# Altium PCB STAND_SSD_2246(CPU).PcbDoc (part 2 of 7)
Units mm, origin at the board's own origin, x right, y up, seen from the top; angles counter-clockwise.
Board outline 70 x 170 mm, 8 copper layers (L1:Top, L2:GND, L3:Sig, L4:VCC, L5:Sig, L6:Sig, L7:GND, L8:Bot), stack 1.112 mm thick; 174 components, 271 nets, 1671 pads, 771 vias.
Unrouted connection lines stored in the file: 138.
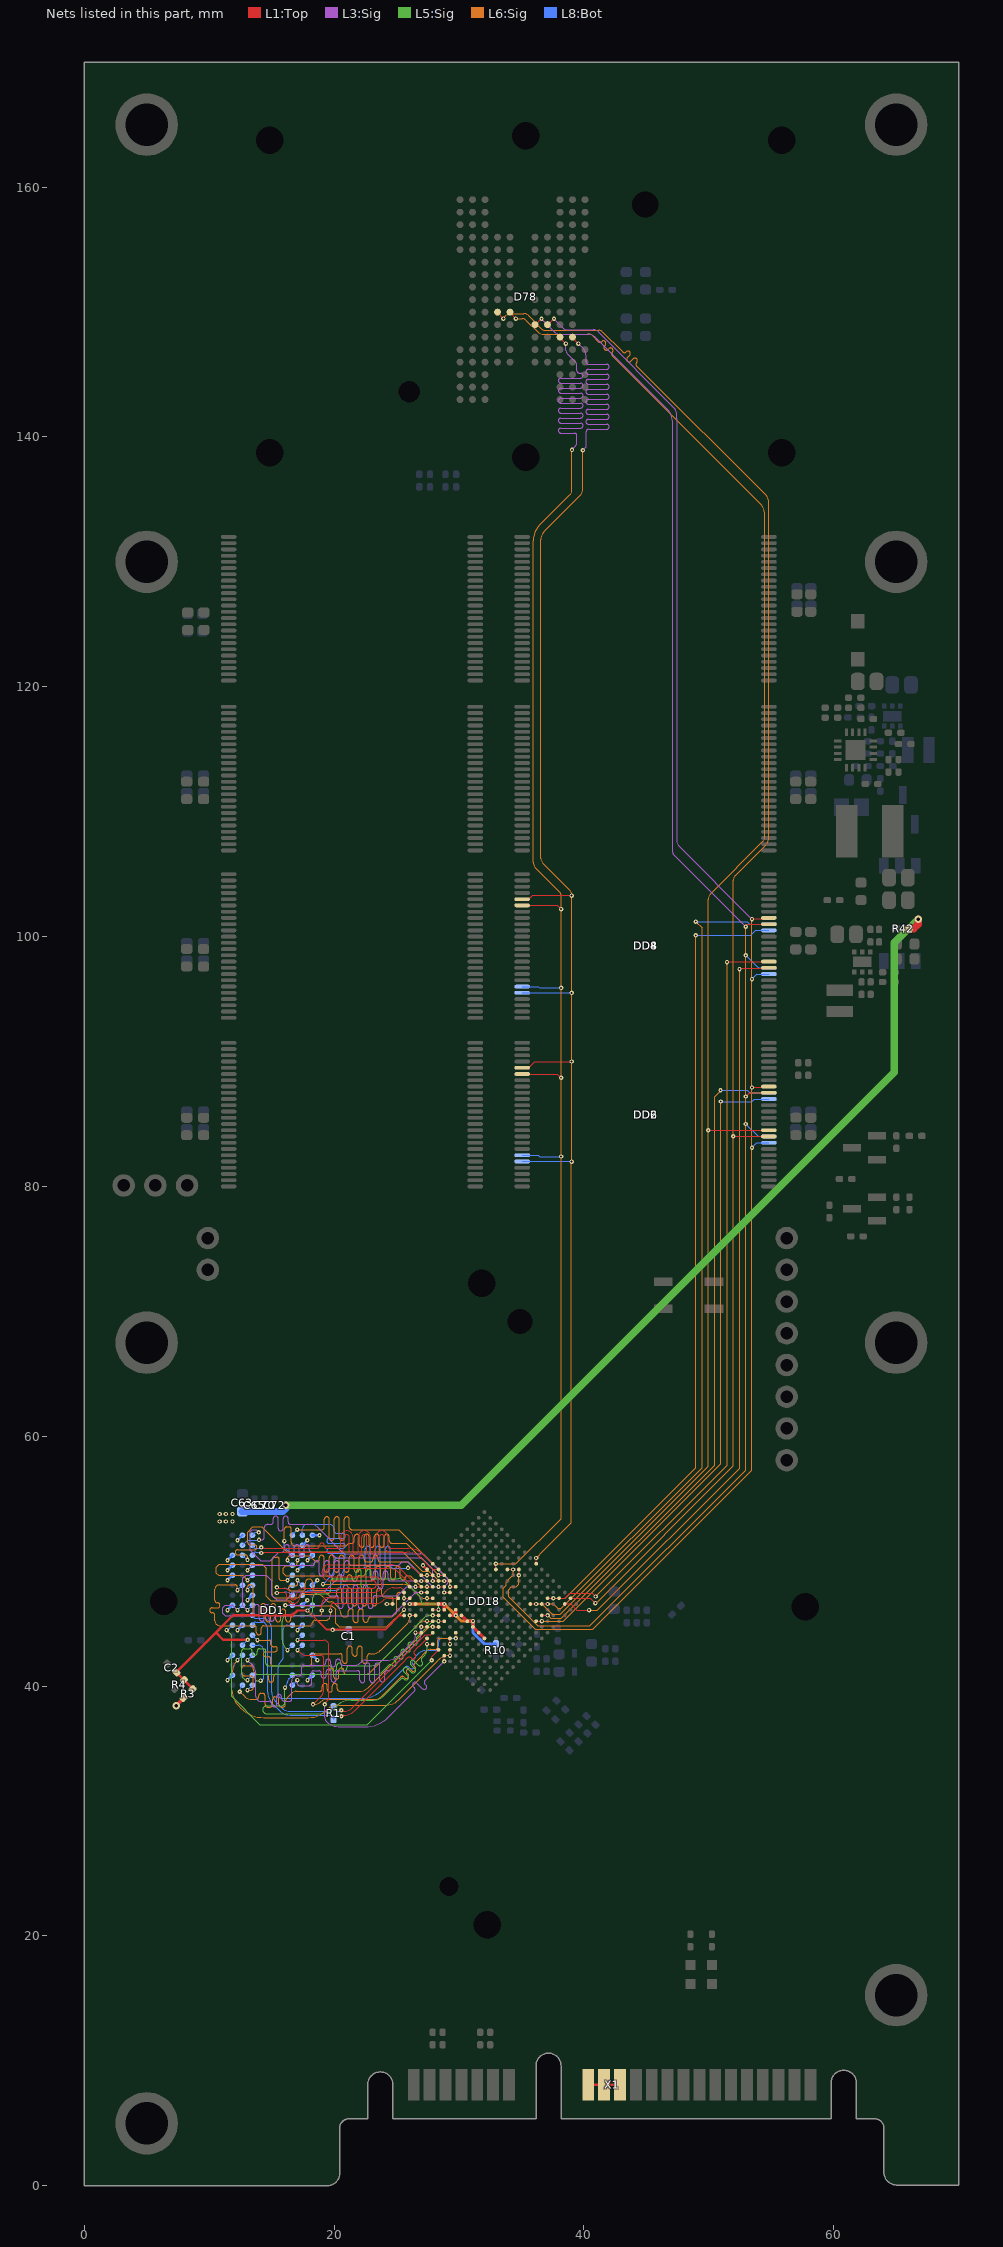
[diagram p8: the nets of this part, all layers, seen from the top]

## Via types
v1: diameter 0.35, hole 0.15, L1:Top to L8:Bot, tented both sides, 722 vias
v2: diameter 0.6, hole 0.3, L1:Top to L8:Bot, tented both sides, 45 vias
v3: diameter 0.6, hole 0.3, L1:Top to L8:Bot, tented bottom, 4 vias

## Nets (pads, with @x,y where several pads share a name; then routed paths per layer and width w, separated by ;. In a path a pad name is that pad's centre, name@x,y a point inside that pad or via, vN(x,y) a via of type N, cw(c..) or ccw(c..) an arc to the next point about the centre after c; other vN are vias at no path point) (continued)
A8: DD1.T8 DD18.C11 | length 24
  L1:Top w0.1: v1(27.903,44.741) DD18.C11@28.363,44.741
  L6:Sig w0.1: v1(12.45,39.554) 12.794,39.21 ccw(c13.439,39.855) 13.29,38.955 ccw(c13.439,39.855) 13.439,38.943 13.783,38.943 ccw(c13.783,39.12) 13.82,38.947 ccw(c13.783,39.12) 13.961,39.12 13.961,39.24 cw(c14.142,39.24) 14.142,39.421 14.28,39.421 cw(c14.28,39.218) 14.44,39.342 cw(c14.28,39.218) 14.447,39.333 cw(c14.28,39.218) 14.482,39.218 14.482,38.548 ccw(c14.707,38.548) 14.707,38.323 14.847,38.323 ccw(c14.847,38.552) 15.077,38.552 15.077,38.951 cw(c15.274,38.951) 15.274,39.148 15.357,39.148 cw(c15.357,38.929) 15.421,39.138 cw(c15.357,38.929) 15.576,38.948 cw(c15.357,38.929) 15.576,38.943 cw(c15.357,38.929) 15.577,38.929 15.577,38.538 ccw(c15.792,38.538) 15.792,38.323 15.899,38.323 ccw(c15.899,38.531) 16.107,38.531 16.107,38.739 cw(c16.567,38.739) 16.241,39.064 16.616,39.438 cw(c16.98,39.074) 16.955,39.589 cw(c16.98,39.074) 16.98,39.589 ; 16.92,39.589 16.98,39.589 ; 21.62,39.588 22.039,39.588 ccw(c22.039,40.595) 22.751,39.883 27.444,44.576 cw(c27.843,44.176) 27.843,44.741 v1(27.903,44.741) ; 21.62,39.589 20.77,39.589 20.462,39.589 cw(c20.462,39.789) 20.262,39.789 20.262,40.004 ccw(c20.062,40.004) 19.862,40.004 19.862,39.732 cw(c19.662,39.732) 19.462,39.732 19.462,40.004 ccw(c19.262,40.004) 19.062,40.004 19.062,39.789 cw(c18.862,39.789) 18.862,39.589 18.812,39.589 16.98,39.589
  L8:Bot w0.1: v1(12.45,39.554) cw(c13.185,39.554) 12.665,40.074 DD1.T8@12.67,40.079
A9: DD1.R3 DD18.A10 | length 24
  L1:Top w0.1: v1(27.444,43.362) DD18.A10@27.903,43.362
  L5:Sig w0.1: v1(16.077,39.879) 16.065,39.879 16.065,38.695 cw(c15.784,38.695) 15.784,38.414 14.598,38.414 ccw(c14.598,38.107) 14.291,38.108 14.291,38.106 ccw(c14.595,38.107) 14.595,37.803 18.776,37.803 ccw(c18.776,39.832) 18.903,37.807 ccw(c18.776,39.832) 20.211,38.397 cw(c21.382,37.226) 21.382,38.882 23.132,38.882 ccw(c23.132,40.156) 24.033,39.255 25.079,40.302 25.336,40.558 cw(c25.477,40.417) 25.618,40.558 25.624,40.552 ccw(c25.766,40.694) 25.907,40.552 ccw(c25.766,40.694) 25.907,40.835 25.587,41.155 cw(c25.729,41.296) 25.587,41.438 cw(c25.729,41.296) 25.87,41.438 26.19,41.118 ccw(c26.331,41.26) 26.473,41.118 ccw(c26.331,41.26) 26.473,41.401 26.153,41.721 cw(c26.294,41.862) 26.153,42.004 cw(c26.294,41.862) 26.436,42.004 26.755,41.684 ccw(c26.897,41.825) 27.038,41.684 ccw(c26.897,41.825) 27.038,41.967 27.033,41.972 cw(c27.174,42.114) 27.033,42.255 27.068,42.291 27.208,42.431 ccw(c26.64,42.999) 27.444,42.999 v1(27.444,43.362)
  L8:Bot w0.1: v1(16.077,39.879) 16.108,39.911 ccw(c15.761,40.257) 16.252,40.257 cw(c16.742,40.257) 16.395,40.604 ; 16.395,40.604 DD1.R3@16.67,40.879
A10: DD1.L7 DD18.B14 | length 24
  L1:Top w0.1: v1(26.065,45.66) DD18.B14@26.524,45.66
  L6:Sig w0.1: v1(13.869,43.681) 14.81,43.681 cw(c14.81,43.533) 14.915,43.637 cw(c14.861,43.583) 14.937,43.583 14.937,43.417 14.937,43.367 ccw(c15.137,43.367) 15.137,43.167 15.268,43.167 cw(c15.268,42.967) 15.268,42.767 14.536,42.767 ccw(c14.536,42.567) 14.536,42.367 14.737,42.367 cw(c14.737,42.167) 14.937,42.167 14.937,41.775 ccw(c15.069,41.775) 15.069,41.643 18.02,41.643 ccw(c18.02,41.843) 18.22,41.843 18.22,42.331 cw(c18.49,42.331) 18.49,42.6 20.17,42.6 20.47,42.6 cw(c20.47,42.4) 20.67,42.4 20.67,42.027 ccw(c20.87,42.027) 21.07,42.027 21.07,42.994 cw(c21.27,42.994) 21.47,42.994 21.47,42.606 ccw(c21.67,42.606) 21.87,42.606 21.87,42.994 cw(c22.07,42.994) 22.27,42.994 22.27,42.027 ccw(c22.47,42.027) 22.67,42.027 22.67,42.4 cw(c22.87,42.4) 22.87,42.6 22.92,42.6 23.103,42.6 ccw(c23.103,43.472) 23.72,42.855 ; 23.72,42.856 25.902,45.038 ccw(c25.51,45.43) 26.065,45.43 v1(26.065,45.66)
  L8:Bot w0.1: DD1.L7@13.47,44.079 v1(13.869,43.681)
A11: DD1.R7 DD18.D12 | length 23.9
  L1:Top w0.1: v1(27.903,45.66) DD18.D12@28.363,45.66
  L5:Sig w0.1: v1(13.072,40.481) cw(c13.072,40.932) 12.62,40.932 12.62,42.823 cw(c12.794,42.823) 12.794,42.997 13.244,42.997 cw(c13.244,42.797) 13.444,42.797 13.444,42.664 ccw(c13.644,42.664) 13.844,42.664 13.844,42.797 cw(c14.044,42.797) 14.044,42.997 14.359,42.997 14.434,42.98 cw(c14.359,42.816) 14.484,42.946 cw(c14.359,42.816) 14.54,42.816 14.54,41.843 ccw(c14.74,41.843) 14.74,41.643 19.199,41.643 19.62,41.643 cw(c19.62,41.443) 19.82,41.443 19.82,41.418 ccw(c20.02,41.418) 20.22,41.418 20.22,41.634 cw(c20.42,41.634) 20.62,41.634 20.62,41.418 ccw(c20.82,41.418) 21.02,41.418 21.02,41.443 cw(c21.22,41.443) 21.22,41.643 21.27,41.643 23.027,41.643 ccw(c23.027,42.608) 23.709,41.925 25.711,43.928 27.281,45.498 cw(c27.673,45.105) 27.673,45.66 v1(27.903,45.66)
  L8:Bot w0.1: v1(13.072,40.481) DD1.R7@13.47,40.879
A12: DD1.N7 DD18.A12 | length 23.9
  L1:Top w0.1: v1(26.524,44.281) DD18.A12@26.984,44.281
  L3:Sig w0.1: v1(13.072,42.081) 13.456,41.697 cw(c12.802,41.043) 13.727,41.043 13.727,39.182 ccw(c14.108,39.182) 14.108,38.8 14.349,38.8 14.799,38.8 cw(c14.799,38.6) 14.999,38.6 14.999,38.548 ccw(c15.199,38.548) 15.399,38.548 15.399,39.133 cw(c15.599,39.133) 15.799,39.133 15.799,39 ccw(c15.999,39) 15.999,38.8 16.382,38.8 16.474,38.8 ccw(c16.474,38.927) 16.601,38.927 16.601,40.441 cw(c17.003,40.441) 17.003,40.843 17.248,40.843 ccw(c17.248,41.015) 17.42,41.015 17.42,41.535 cw(c17.553,41.535) 17.553,41.667 19.072,41.667 19.122,41.667 ccw(c19.122,41.867) 19.322,41.867 19.322,41.96 cw(c19.522,41.96) 19.722,41.96 19.722,41.744 ccw(c19.922,41.744) 20.122,41.744 20.122,41.96 cw(c20.322,41.96) 20.522,41.96 20.522,41.867 ccw(c20.722,41.867) 20.722,41.667 21.38,41.667 21.699,41.667 ccw(c21.699,42.057) 21.86,41.702 ccw(c21.48,42.542) 22.169,41.93 cw(c22.244,41.863) 22.173,41.934 cw(c22.53,41.573) 22.53,42.081 24.34,42.081 ccw(c24.34,43.279) 25.187,42.431 26.343,43.588 ccw(c25.906,44.025) 26.524,44.025 v1(26.524,44.281)
  L8:Bot w0.1: v1(13.072,42.081) DD1.N7@13.47,42.479
A13: DD1.T3 DD18.B12 | length 23.9
  L1:Top w0.1: v1(26.984,44.741) DD18.B12@27.444,44.741
  L3:Sig w0.1: v1(17.069,40.478) 17.069,40.194 ccw(c17.22,40.194) 17.22,40.043 18.009,40.043 ccw(c18.009,40.254) 18.22,40.254 18.22,41.101 cw(c18.362,41.101) 18.362,41.243 18.459,41.243 18.768,41.243 cw(c18.768,41.043) 18.968,41.043 18.968,40.839 ccw(c19.168,40.839) 19.368,40.839 19.368,41.142 cw(c19.568,41.142) 19.768,41.142 19.768,40.522 ccw(c19.968,40.522) 20.168,40.522 20.168,41.043 cw(c20.368,41.043) 20.368,41.243 20.418,41.243 21.541,41.243 21.591,41.243 21.87,41.243 cw(c21.87,41.043) 22.07,41.043 22.07,40.484 ccw(c22.27,40.484) 22.47,40.484 22.47,41.652 cw(c22.67,41.652) 22.87,41.652 22.87,40.484 ccw(c23.07,40.484) 23.27,40.484 23.27,41.652 cw(c23.47,41.652) 23.67,41.652 23.67,40.54 ccw(c23.87,40.54) 24.07,40.54 24.07,41.043 cw(c24.27,41.043) 24.27,41.243 24.32,41.243 24.378,41.243 ccw(c24.378,41.346) 24.451,41.273 26.674,43.497 ; 26.674,43.497 ccw(c25.926,44.244) 26.984,44.244 v1(26.984,44.741)
  L8:Bot w0.1: DD1.T3@16.67,40.079 v1(17.069,40.478)
A14: DD1.T7 DD18.C12 | length 23.9
  L1:Top w0.1: v1(27.443,45.201) DD18.C12@27.903,45.201
  L6:Sig w0.1: v1(13.072,39.681) 13.337,39.681 ccw(c13.337,39.883) 13.54,39.883 13.54,40.593 ccw(c13.32,40.593) 13.32,40.813 12.872,40.813 cw(c12.872,41.064) 12.62,41.064 12.62,41.424 cw(c12.839,41.424) 12.839,41.643 13.32,41.643 cw(c13.32,41.443) 13.52,41.443 13.52,41.35 ccw(c13.927,41.35) 13.805,40.962 ccw(c13.927,41.35) 13.927,40.943 14.115,40.943 14.565,40.943 cw(c14.565,40.743) 14.765,40.743 14.765,40.515 ccw(c14.965,40.515) 15.165,40.515 15.165,40.743 cw(c15.365,40.743) 15.365,40.943 15.92,40.943 19.336,40.943 19.386,40.943 ccw(c19.386,41.143) 19.586,41.143 19.586,41.241 cw(c19.786,41.241) 19.986,41.241 19.986,40.77 ccw(c20.186,40.77) 20.386,40.77 20.386,41.241 cw(c20.586,41.241) 20.786,41.241 20.786,41.143 ccw(c20.986,41.143) 20.986,40.943 21.366,40.943 22.452,40.943 ccw(c22.452,41.606) 22.92,41.137 26.821,45.038 cw(c27.214,44.646) 27.214,45.201 v1(27.443,45.201)
  L8:Bot w0.1: v1(13.072,39.681) DD1.T7@13.47,40.079
A15: DD1.M7 DD18.D11 | length 24
  L1:Top w0.1: v1(28.363,45.201) DD18.D11@28.822,45.201
  L5:Sig w0.1: v1(14.12,40.443) 13.793,40.443 cw(c13.793,40.537) 13.699,40.537 13.699,40.83 cw(c13.812,40.83) 13.812,40.943 23.355,40.943 ccw(c23.355,41.645) 23.851,41.148 24.045,41.342 24.363,41.66 cw(c24.504,41.519) 24.646,41.66 24.652,41.654 ccw(c24.793,41.796) 24.935,41.654 ccw(c24.793,41.796) 24.935,41.937 24.842,42.03 cw(c24.983,42.171) 24.842,42.313 cw(c24.983,42.171) 25.125,42.313 25.217,42.22 ccw(c25.359,42.361) 25.5,42.22 ccw(c25.359,42.361) 25.5,42.503 25.408,42.596 cw(c25.549,42.737) 25.408,42.878 cw(c25.549,42.737) 25.69,42.878 25.783,42.786 ccw(c25.925,42.927) 26.066,42.786 ccw(c25.925,42.927) 26.066,43.069 25.973,43.161 cw(c26.115,43.303) 25.973,43.444 cw(c26.115,43.303) 26.256,43.444 26.349,43.351 ccw(c26.49,43.493) 26.632,43.351 ccw(c26.49,43.493) 26.632,43.634 26.626,43.64 cw(c26.767,43.782) 26.626,43.923 26.886,44.183 27.741,45.038 ; 27.741,45.038 cw(c28.133,44.646) 28.133,45.201 v1(28.363,45.201)
  L8:Bot w0.1: DD1.M7@13.47,43.279 13.927,43.279 cw(c13.927,42.84) 14.366,42.84 14.366,40.688 cw(c14.12,40.688) v1(14.12,40.443)
BA_0: DD1.M2 DD18.C9 | length 24.3
  L1:Top w0.1: v1(17.072,42.881) 17.238,42.714 ccw(c17.805,43.282) 17.805,42.479 18.923,42.479 cw(c18.923,42.226) 19.177,42.226 19.177,39.69 ; v1(18.32,38.543) 18.343,38.543 18.955,39.154 ; v1(29.282,43.362) DD18.C9@29.282,43.822 ; 18.955,39.155 ccw(c18.419,39.69) 19.177,39.69 ; 18.955,39.155 ccw(c18.419,39.69) 19.177,39.69 ; 18.955,39.155 ccw(c18.419,39.69) 19.177,39.69 ; 18.955,39.155 ccw(c18.419,39.69) 19.177,39.69
  L6:Sig w0.1: v1(18.32,38.543) 18.464,38.543 ccw(c18.464,39.197) 18.927,38.734 cw(c19.43,38.231) 19.43,38.943 23.306,38.943 ccw(c23.308,39.528) 23.722,39.114 25.005,40.398 25.323,40.716 cw(c25.465,40.574) 25.606,40.716 25.642,40.68 ccw(c25.783,40.822) 25.924,40.68 ccw(c25.783,40.822) 25.924,40.963 25.849,41.038 cw(c25.991,41.18) 25.849,41.321 cw(c25.991,41.18) 26.132,41.321 26.207,41.246 ccw(c26.349,41.387) 26.49,41.246 ccw(c26.349,41.387) 26.49,41.529 26.455,41.564 cw(c26.596,41.706) 26.455,41.847 26.728,42.12 27.439,42.831 cw(c27.709,42.562) 27.709,42.943 28.099,42.943 ccw(c28.099,43.151) 28.307,43.151 28.307,43.718 cw(c28.42,43.718) 28.42,43.831 29.163,43.831 cw(c29.163,43.712) 29.282,43.712 v1(29.282,43.362)
  L8:Bot w0.1: v1(17.072,42.881) DD1.M2@17.47,43.279
BA_1: DD1.N8 DD18.B8 | length 23.9
  L1:Top w0.1: v1(29.282,42.443) DD18.B8@29.282,42.902
  L6:Sig w0.1: v1@12.271,42.08 ccw(c13.361,40.991) 11.82,40.991 11.82,39.681 ccw(c13.555,39.681) 12.328,38.454 12.547,38.236 ccw(c14.377,40.065) 14.377,37.478 ; 14.378,37.478 17.95,37.478 ccw(c17.95,39.501) 19.381,38.07 cw(c20.38,37.071) 20.38,38.484 24.189,38.484 ccw(c24.19,39.868) 25.17,38.891 28.349,42.071 cw(c29.247,41.173) 29.247,42.443 v1(29.282,42.443)
  L8:Bot w0.1: v1(12.272,42.081) DD1.N8@12.67,42.479
BA_2: DD1.M3 DD18.D13 | length 23.9
  L1:Top w0.1: DD18.D13@27.903,46.12 v1(28.363,46.12)
  L5:Sig w0.1: v1(16.272,42.881) 16.139,43.013 cw(c16.833,43.707) 15.852,43.707 15.852,45.201 cw(c16.338,45.201) 16.338,45.687 17.92,45.687 ccw(c17.92,46.052) 18.286,46.052 18.286,47.063 cw(c18.63,47.063) 18.63,47.407 19.447,47.407 ccw(c19.447,47.681) 19.72,47.681 19.72,48.38 cw(c19.928,48.38) 19.928,48.587 21.527,48.587 21.577,48.587 ccw(c21.577,48.787) 21.777,48.787 21.777,49.147 cw(c21.977,49.147) 22.177,49.147 22.177,48.003 ccw(c22.377,48.003) 22.577,48.003 22.577,49.147 cw(c22.777,49.147) 22.977,49.147 22.977,48.787 ccw(c23.177,48.787) 23.177,48.587 23.76,48.587 25.143,48.587 cw(c25.143,47.88) 25.643,48.38 26.804,47.219 cw(c26.368,46.784) 26.984,46.784 ccw(c27.188,46.784) 27.188,46.579 28.229,46.579 28.363,46.446 v1(28.363,46.12)
  L8:Bot w0.1: v1(16.272,42.881) DD1.M3@16.67,43.279
CAS#: DD1.K3 DD18.D9 | length 24
  L1:Top w0.1: v1(29.742,43.822) DD18.D9@29.742,44.281
  L8:Bot w0.1: 15.723,41.95 ccw(c16.215,41.459) 15.519,41.459 15.519,39.351 ccw(c15.852,39.351) 15.852,39.018 22.148,39.018 ccw(c22.148,41.558) 23.944,39.762 25.26,41.079 25.701,41.52 cw(c25.843,41.378) 25.984,41.52 26.069,41.434 ccw(c26.211,41.576) 26.352,41.434 ccw(c26.211,41.576) 26.352,41.717 26.267,41.802 cw(c26.408,41.944) 26.267,42.085 26.302,42.121 26.797,42.615 ; 15.723,41.951 15.825,42.053 ccw(c15.579,42.298) 15.927,42.298 15.927,44.547 cw(c16.259,44.547) 16.259,44.879 DD1.K3@16.67,44.879 ; 26.797,42.616 cw(c27.383,42.029) 27.383,42.858 28.04,42.858 ccw(c28.04,43.181) 28.363,43.181 28.363,43.557 cw(c28.627,43.557) 28.627,43.822 v1(29.742,43.822)
CDI/DEVSLP: X1.8 X1.9 X1.10 | length 2.5
  L1:Top w0.2: X1.8@40.354,8.098 X1.9@41.624,8.098 X1.10@42.894,8.098
CKE_0: DD1.K9 DD18.A9 | length 26.2
  L1:Top w0.1: v1(27.82,42.068) 27.82,42.36 DD18.A9@28.363,42.902
  L5:Sig w0.1: v1(11.402,44.48) 11.82,44.062 11.82,39.174 14.072,36.923 22.675,36.923 v1(27.82,42.068)
  L8:Bot w0.1: v1(11.402,44.48) 11.472,44.48 DD1.K9@11.87,44.879
CNFG0: 
CNFG1: 
CNFG2: 
CS#_0: DD1.L2 DD18.A8 | length 23.2
  L1:Top w0.1: v1(17.072,43.681) 19.171,43.681 cw(c19.171,43.272) 19.58,43.272 19.58,38.933 v1@19.226,38.58 ; v1(28.822,41.983) DD18.A8@28.822,42.443
  L3:Sig w0.1: v1(19.256,38.543) 19.256,37.511 ccw(c19.766,37.511) 19.406,37.15 ccw(c20.348,38.093) 20.348,36.76 22.547,36.76 ccw(c22.547,39.3) 22.948,36.792 ccw(c22.547,39.3) 24.343,37.504 26.396,39.556 26.431,39.592 ccw(c26.29,39.733) 26.431,39.875 26.339,39.966 cw(c26.481,40.108) 26.339,40.249 cw(c26.481,40.108) 26.622,40.249 27.08,39.792 ccw(c27.221,39.933) 27.363,39.792 ccw(c27.221,39.933) 27.363,40.074 27.28,40.157 cw(c27.421,40.299) 27.28,40.44 27.494,40.654 v1(28.822,41.983)
  L8:Bot w0.1: v1(17.072,43.681) DD1.L2@17.47,44.079
CS_N0: 
CS_N1: 
CSEL: 
DA_0: 
DA_1: 
DA_2: 
DD0: 
DD1: 
DD2: 
DD3: 
DD4: 
DD5: 
DD6: 
DD7: 
DD8: 
DD9: 
DD10: 
DD11: 
DD12: 
DD13: 
DD14: 
DD15: 
DDR_CLK_N: DD1.K7 DD18.A11 R1.1 | length 24
  L1:Top w0.1: v1@20.578,37.6 20.587,37.61 cw(c20.68,37.517) 20.68,37.648 20.715,37.648 ccw(c20.715,37.694) 20.748,37.662 cw(c20.781,37.629) 20.781,37.675 20.783,37.675 ccw(c20.783,38.917) 21.661,38.039 25.561,41.939 ; 25.563,41.942 25.881,42.259 cw(c26.022,42.118) 26.164,42.259 26.2,42.223 ccw(c26.341,42.364) 26.482,42.223 ccw(c26.341,42.364) 26.482,42.506 26.447,42.542 cw(c26.588,42.683) 26.447,42.825 26.68,43.058 26.906,43.284 27.175,43.553 DD18.A11@27.444,43.822
  L8:Bot w0.1: DD1.K7@13.47,44.879 cw(c13.72,44.879) 13.72,45.129 14.314,45.129 ; 14.315,45.129 cw(c14.314,44.917) 14.463,45.068 ; 14.464,45.066 cw(c13.889,44.493) 14.702,44.493 14.702,39.525 ccw(c16.064,39.525) 15.1,38.562 15.612,38.05 ccw(c16.497,38.935) 16.497,37.684 19.682,37.684 cw(c19.682,37.584) 19.752,37.655 19.782,37.625 19.782,37.621 19.891,37.512 cw(c19.713,37.334) R1.1@19.965,37.334 cw(c20.216,37.334) 20.038,37.512 20.148,37.621 20.148,37.625 cw(c20.289,37.484) 20.289,37.684 20.494,37.684 v1@20.578,37.6
  other v1: 20.578,37.585
DDR_CLK_P: DD1.J7 DD18.B11 R1.2 | length 24
  L1:Top w0.1: v1@20.578,38.05 20.587,38.041 ccw(c20.68,38.133) 20.68,38.002 20.715,38.002 cw(c20.715,37.956) 20.748,37.989 ccw(c20.781,38.022) 20.781,37.975 ccw(c20.781,38.922) 21.45,38.252 27.32,44.123 27.745,44.123 DD18.B11@27.903,44.281
  L8:Bot w0.1: DD1.J7@13.47,45.679 ccw(c13.72,45.679) 13.72,45.429 14.054,45.429 14.195,45.429 14.316,45.429 cw(c14.316,44.923) 14.674,45.281 14.764,45.192 ; 14.764,45.191 cw(c14.189,44.617) 15.002,44.617 15.002,39.527 ccw(c16.068,39.527) 15.314,38.773 15.824,38.263 ccw(c16.498,38.937) 16.498,37.984 19.682,37.984 ccw(c19.682,38.084) 19.752,38.013 19.782,38.042 19.782,38.047 19.891,38.156 ccw(c19.713,38.334) R1.2@19.965,38.334 ccw(c20.216,38.334) 20.038,38.156 20.148,38.047 20.148,38.042 ccw(c20.289,38.184) 20.289,37.984 20.512,37.984 v1@20.578,38.05
  other v1: 20.578,38.065
DDR_VREF: C1.1 C2.1 DD1.H1 DD1.M8 DD18.A15 R3.1 R4.2 | length 28.4
  L1:Top w0.15: v1(17.877,46.054) 19.406,44.525 24.086,44.525 25.22,45.66 DD18.A15@25.605,45.66
  L1:Top w0.2: C2.1@7.373,41.102 8.635,39.839 cw(c8.548,39.752) R3.1@8.672,39.752 ; C2.1@7.461,41.207 10.544,44.29 ; v1(13.09,43.705) 11.129,43.705 10.544,44.29 ; v1(17.877,46.054) 17.061,46.054 16.686,45.679 11.934,45.679 10.544,44.29
  L8:Bot w0.1: DD1.M8@12.67,43.279 12.67,43.285 v1(13.09,43.705) ; v1(17.877,46.054) 18.27,46.448 DD1.H1@18.27,46.479
  L8:Bot w0.15: v1(19.887,44.507) 19.894,44.515 C1.1@21.181,44.515
DIOR: 
DIOW: 
DM_0: DD1.E7 DD18.B16 | length 23.9
  L1:Top w0.1: v1(25.605,46.12) DD18.B16@25.605,46.579
  L6:Sig w0.1: v1(13.072,48.481) 12.682,48.87 10.751,48.87 10.584,49.037 10.584,49.53 10.797,49.743 14.249,49.743 14.574,49.417 14.574,47.185 14.937,46.822 16.478,46.822 16.857,46.443 19.82,46.443 20.12,46.143 20.12,45.043 20.42,44.743 24.228,44.743 v1(25.605,46.12)
  L8:Bot w0.1: v1(13.072,48.481) DD1.E7@13.47,48.879
DM_1: DD1.D3 DD18.G16 | length 23.9
  L1:Top w0.1: v1(27.444,48.877) DD18.G16@27.903,48.877
  L6:Sig w0.1: v1(16.272,50.078) 16.272,50.283 16.432,50.443 18.02,50.443 18.52,49.943 18.607,49.943 ccw(c18.607,50.143) 18.807,50.143 18.807,50.272 cw(c19.007,50.272) 19.007,50.472 cw(c19.007,50.272) 19.207,50.272 19.207,49.943 19.207,49.328 ccw(c19.407,49.328) 19.407,49.128 ccw(c19.407,49.328) 19.607,49.328 19.607,49.943 19.607,50.272 cw(c19.807,50.272) 19.807,50.472 cw(c19.807,50.272) 20.007,50.272 20.007,49.943 20.007,49.328 ccw(c20.207,49.328) 20.207,49.128 ccw(c20.207,49.328) 20.407,49.328 20.407,49.943 20.407,50.272 cw(c20.607,50.272) 20.607,50.472 cw(c20.607,50.272) 20.807,50.272 20.807,49.943 20.807,49.328 ccw(c21.007,49.328) 21.007,49.128 ccw(c21.007,49.328) 21.207,49.328 21.207,49.943 21.207,50.272 cw(c21.407,50.272) 21.407,50.472 cw(c21.407,50.272) 21.607,50.272 21.607,49.943 21.607,49.328 ccw(c21.807,49.328) 21.807,49.128 ccw(c21.807,49.328) 22.007,49.328 22.007,49.943 22.007,50.272 cw(c22.207,50.272) 22.207,50.472 cw(c22.207,50.272) 22.407,50.272 22.407,50.143 ccw(c22.607,50.143) 22.607,49.943 22.807,49.943 22.92,49.943 ccw(c22.92,50.143) 23.12,50.143 23.12,50.272 cw(c23.32,50.272) 23.32,50.472 cw(c23.32,50.272) 23.52,50.272 23.52,50.126 ccw(c23.704,50.126) 23.704,49.943 25.92,49.943 26.136,49.727 26.986,48.877 v1(27.444,48.877)
  L8:Bot w0.1: v1(16.272,50.078) DD1.D3@16.67,49.679
DMACK: 
DMARQ: 
DQ0: DD1.E3 DD18.C16 | length 24
  L1:Top w0.1: v1(25.605,47.039) DD18.C16@26.065,47.039
  L6:Sig w0.1: v1(16.272,48.481) 15.746,48.481 cw(c15.746,48.606) 15.62,48.606 15.62,50.139 ccw(c15.428,50.139) 15.428,50.331 15.22,50.331 ccw(c15.22,50.151) 15.04,50.151 15.04,47.343 ccw(c15.316,47.343) 15.316,47.067 16.95,47.067 ccw(c16.95,47.538) 17.282,47.205 ; 17.283,47.205 cw(c17.616,46.872) 17.616,47.343 18.62,47.343 cw(c18.62,46.619) 19.133,47.131 19.433,46.83 ccw(c19.644,47.041) 19.644,46.743 19.767,46.743 cw(c19.767,46.373) 20.029,46.635 20.379,46.284 ; 20.379,46.284 cw(c20.038,45.943) 20.52,45.943 20.52,45.843 ccw(c20.82,45.843) 20.82,45.543 20.893,45.543 20.943,45.543 ccw(c20.943,45.743) 21.143,45.743 21.143,45.975 cw(c21.343,45.975) 21.543,45.975 21.543,45.29 ccw(c21.743,45.29) 21.943,45.29 21.943,45.975 cw(c22.143,45.975) 22.343,45.975 22.343,45.315 ccw(c22.543,45.315) 22.743,45.315 22.743,45.343 cw(c22.943,45.343) 22.943,45.543 23.24,45.543 24.502,45.543 ccw(c24.502,45.943) 24.784,45.66 24.93,45.805 ; 24.93,45.806 ccw(c24.712,46.024) 25.02,46.024 25.02,47.285 cw(c25.235,47.285) 25.235,47.499 25.395,47.499 cw(c25.395,47.29) 25.605,47.29 v1(25.605,47.039)
  L8:Bot w0.1: v1(16.272,48.481) DD1.E3@16.67,48.879
DQ1: DD1.F7 DD18.C17 | length 23.9
  L1:Top w0.1: v1(19.02,46.054) 19.02,46.582 cw(c19.531,46.582) 19.531,47.093 23.265,47.093 ccw(c23.265,48.054) 23.944,47.374 ; 23.945,47.375 24.226,47.656 cw(c24.782,47.1) 24.782,47.886 25.217,47.886 cw(c25.217,47.499) DD18.C17@25.605,47.499
  L6:Sig w0.1: v1(13.072,47.681) 13.072,47.929 cw(c13.242,47.929) 13.242,48.099 13.346,48.099 cw(c13.346,47.906) 13.54,47.906 13.54,45.838 ccw(c13.717,45.838) 13.717,45.66 13.885,45.66 13.935,45.66 ccw(c13.935,45.86) 14.135,45.86 14.135,46.392 cw(c14.335,46.392) 14.535,46.392 14.535,45.35 ccw(c14.735,45.35) 14.935,45.35 14.935,46.392 cw(c15.135,46.392) 15.335,46.392 15.335,45.35 ccw(c15.535,45.35) 15.735,45.35 15.735,45.954 cw(c15.935,45.954) 16.135,45.954 16.135,45.35 ccw(c16.335,45.35) 16.535,45.35 16.535,45.46 cw(c16.735,45.46) 16.735,45.66 17.282,45.66 18.848,45.66 ccw(c18.848,45.833) 19.02,45.833 v1(19.02,46.054)
  L8:Bot w0.1: v1(13.072,47.681) 13.072,47.725 13.426,48.079 DD1.F7@13.47,48.079
DQ2: DD1.F2 DD18.A17 | length 24
  L1:Top w0.1: v1(24.226,46.579) DD18.A17@24.686,46.579
  L6:Sig w0.1: 16.528,47.643 17.521,47.643 ccw(c17.521,47.826) 17.704,47.826 17.704,48.254 cw(c18.017,48.254) 17.705,48.277 cw(c18.017,48.254) 18.017,48.566 cw(c18.017,48.303) 18.28,48.303 18.28,47.815 ccw(c18.433,47.815) 18.433,47.662 19.201,47.662 cw(c19.201,47.643) 19.22,47.643 19.714,47.149 20.02,47.149 ccw(c20.02,47.349) 20.22,47.349 20.22,47.649 cw(c20.42,47.649) 20.42,47.849 cw(c20.42,47.649) 20.62,47.649 20.62,47.149 20.62,46.807 ccw(c20.82,46.807) 20.82,46.607 ccw(c20.82,46.807) 21.02,46.807 21.02,47.149 21.02,47.649 cw(c21.22,47.649) 21.22,47.849 cw(c21.22,47.649) 21.42,47.649 21.42,47.149 21.42,46.637 ccw(c21.62,46.637) 21.62,46.437 ccw(c21.62,46.637) 21.82,46.637 21.82,47.149 21.82,47.649 cw(c22.02,47.649) 22.02,47.849 cw(c22.02,47.649) 22.22,47.649 22.22,47.149 22.22,46.637 ccw(c22.42,46.637) 22.42,46.437 ccw(c22.42,46.637) 22.62,46.637 22.62,47.149 22.62,47.649 cw(c22.82,47.649) 22.82,47.849 cw(c22.82,47.649) 23.02,47.649 23.02,47.149 23.02,46.637 ccw(c23.22,46.637) 23.22,46.437 ccw(c23.22,46.637) 23.42,46.637 23.42,47.149 23.42,47.649 cw(c23.62,47.649) 23.62,47.849 cw(c23.62,47.649) 23.82,47.649 23.82,47.349 ccw(c24.02,47.349) 24.02,47.149 24.61,47.149 24.72,47.039 24.72,46.679 24.62,46.579 v1(24.226,46.579) ; 16.542,47.643 cw(c16.542,47.803) 16.382,47.803 16.382,47.924 cw(c16.507,47.924) 16.507,48.049 16.95,48.049 ccw(c16.95,48.181) 17.082,48.181 17.082,48.453 ccw(c17.046,48.453) v1(17.072,48.478)
  L8:Bot w0.1: v1(17.072,48.478) DD1.F2@17.47,48.079
DQ3: DD1.F8 DD18.B17 | length 24.1
  L1:Top w0.1: v1(19.72,46.043) 19.72,46.398 cw(c19.965,46.398) 19.965,46.643 23.44,46.643 ccw(c23.44,47.319) 23.918,46.841 cw(c24.397,46.363) 24.397,47.039 DD18.B17@25.145,47.039
  L6:Sig w0.1: v1(12.272,47.681) 12.272,47.91 ccw(c12.083,47.91) 12.083,48.099 10.805,48.099 ccw(c10.805,47.758) 10.464,47.758 10.464,47.408 10.464,46.869 ccw(c10.664,46.869) 10.664,46.669 10.671,46.669 cw(c10.671,46.469) 10.671,46.269 10.25,46.269 ccw(c10.25,46.069) 10.25,45.869 10.264,45.869 cw(c10.264,45.669) 10.464,45.669 10.464,45.619 10.464,45.252 ccw(c10.874,45.252) 10.874,44.843 13.09,44.843 13.589,44.843 cw(c13.589,44.643) 13.789,44.643 13.789,44.304 ccw(c13.989,44.304) 14.189,44.304 14.189,44.643 cw(c14.389,44.643) 14.389,44.843 14.439,44.843 18.07,44.843 ccw(c18.07,45.039) 18.266,45.039 cw(c18.492,45.039) 18.492,45.265 19.32,45.265 ccw(c19.32,45.665) 19.72,45.665 v1(19.72,46.043)
  L8:Bot w0.1: v1(12.272,47.681) DD1.F8@12.67,48.079 DD1.F8@12.67,48.06
DQ4: DD1.H3 DD18.E16 | length 24
  L1:Top w0.1: v1(26.524,47.958) DD18.E16@26.984,47.958
  L3:Sig w0.1: v1(16.107,46.479) 18.957,46.479 19.72,47.243 20.22,47.243 cw(c20.22,47.143) 20.32,47.143 20.32,46.424 ccw(c20.52,46.424) 20.52,46.224 ccw(c20.52,46.424) 20.72,46.424 20.72,47.243 20.72,47.894 cw(c20.92,47.894) 20.92,48.094 cw(c20.92,47.894) 21.12,47.894 21.12,47.243 21.12,46.424 ccw(c21.32,46.424) 21.32,46.224 ccw(c21.32,46.424) 21.52,46.424 21.52,47.243 21.52,47.894 cw(c21.72,47.894) 21.72,48.094 cw(c21.72,47.894) 21.92,47.894 21.92,47.243 21.92,46.424 ccw(c22.12,46.424) 22.12,46.224 ccw(c22.12,46.424) 22.32,46.424 22.32,47.243 22.32,47.894 cw(c22.52,47.894) 22.52,48.094 cw(c22.52,47.894) 22.72,47.894 22.72,47.243 22.72,46.424 ccw(c22.92,46.424) 22.92,46.224 ccw(c22.92,46.424) 23.12,46.424 23.12,47.043 cw(c23.32,47.043) 23.32,47.243 25.086,47.243 25.801,47.958 v1(26.524,47.958)
  L8:Bot w0.1: v1(16.107,46.479) DD1.H3@16.67,46.479
DQ5: DD1.H8 DD18.E15 | length 24
  L1:Top w0.1: v1(26.984,47.499) DD18.E15@27.444,47.499
  L3:Sig w0.1: v1(12.272,46.081) 11.897,46.456 11.288,46.456 11.111,46.278 11.111,45.83 11.298,45.643 13.42,45.643 ccw(c13.42,45.843) 13.62,45.843 13.62,46.325 cw(c13.82,46.325) 13.82,46.525 cw(c13.82,46.325) 14.02,46.325 14.02,45.643 14.02,45.409 ccw(c14.22,45.409) 14.22,45.209 ccw(c14.22,45.409) 14.42,45.409 14.42,45.643 14.42,46.325 cw(c14.62,46.325) 14.62,46.525 cw(c14.62,46.325) 14.82,46.325 14.82,45.643 14.82,45.409 ccw(c15.02,45.409) 15.02,45.209 ccw(c15.02,45.409) 15.22,45.409 15.22,45.443 cw(c15.42,45.443) 15.42,45.643 16.02,45.643 24.669,45.643 26.524,47.499 v1(26.984,47.499)
  L8:Bot w0.1: v1(12.272,46.081) DD1.H8@12.67,46.479
DQ6: DD1.G2 DD18.F17 | length 24
  L1:Top w0.1: v1(25.92,49.462) 26.16,49.462 cw(c26.16,48.884) 26.567,49.294 26.7,49.161 DD18.F17@26.984,48.877
  L8:Bot w0.1: DD1.G2@17.47,47.279 17.67,47.479 ; 17.671,47.48 cw(c18.153,46.997) 18.153,47.679 20.113,47.679 ccw(c20.113,48.147) 20.58,48.147 20.58,48.879 cw(c21.146,48.879) 21.146,49.445 22.26,49.445 22.31,49.445 ccw(c22.31,49.645) 22.51,49.645 22.51,50.987 cw(c22.71,50.987) 22.91,50.987 22.91,48.803 ccw(c23.11,48.803) 23.31,48.803 23.31,50.987 cw(c23.51,50.987) 23.71,50.987 23.71,48.803 ccw(c23.91,48.803) 24.11,48.803 24.11,50.987 cw(c24.31,50.987) 24.51,50.987 24.51,49.645 ccw(c24.71,49.645) 24.71,49.445 24.982,49.445 25.903,49.445 v1(25.92,49.462)
DQ7: DD1.H7 DD18.F16 | length 24
  L1:Top w0.1: v1(26.984,48.418) DD18.F16@27.444,48.418
  L3:Sig w0.1: v1(13.072,46.081) 12.71,46.443 12.71,48.617 12.97,48.877 14.586,48.877 15.02,48.443 15.02,47.284 15.396,46.908 16.184,46.908 16.819,47.543 19.22,47.543 20.095,48.418 22.92,48.418 ccw(c22.92,48.618) 23.12,48.618 23.12,49.008 cw(c23.32,49.008) 23.32,49.208 cw(c23.32,49.008) 23.52,49.008 23.52,48.418 23.52,47.983 ccw(c23.72,47.983) 23.72,47.783 ccw(c23.72,47.983) 23.92,47.983 23.92,48.418 23.92,49.008 cw(c24.12,49.008) 24.12,49.208 cw(c24.12,49.008) 24.32,49.008 24.32,48.618 ccw(c24.52,48.618) 24.52,48.418 25.22,48.418 v1(26.984,48.418)
  L8:Bot w0.1: v1(13.072,46.081) DD1.H7@13.47,46.479
DQ8: DD1.D7 DD18.G14 | length 24
  L1:Top w0.1: v1(28.363,47.958) DD18.G14@28.822,47.958
  L3:Sig w0.1: v1(13.072,49.281) 13.453,49.662 18.22,49.662 18.255,49.662 ccw(c18.255,49.827) 18.42,49.827 cw(c18.62,49.827) 18.62,50.027 cw(c18.62,49.827) 18.82,49.827 18.82,49.662 18.82,49.034 ccw(c19.02,49.034) 19.02,48.834 ccw(c19.02,49.034) 19.22,49.034 19.22,49.662 19.22,49.827 cw(c19.42,49.827) 19.42,50.027 cw(c19.42,49.827) 19.62,49.827 19.62,49.662 19.62,49.034 ccw(c19.82,49.034) 19.82,48.834 ccw(c19.82,49.034) 20.02,49.034 20.02,49.662 20.02,49.827 cw(c20.22,49.827) 20.22,50.027 cw(c20.22,49.827) 20.42,49.827 20.42,49.662 20.42,49.034 ccw(c20.62,49.034) 20.62,48.834 ccw(c20.62,49.034) 20.82,49.034 20.82,49.662 20.82,49.827 cw(c21.02,49.827) 21.02,50.027 cw(c21.02,49.827) 21.22,49.827 ccw(c21.386,49.827) 21.386,49.662 21.62,49.662 25.186,49.662 25.467,49.943 25.918,49.943 27.903,47.958 v1(28.363,47.958)
  L8:Bot w0.1: v1(13.072,49.281) DD1.D7@13.47,49.679
DQ9: DD1.C3 DD18.H15 | length 24
  L1:Top w0.1: v1(28.363,48.877) DD18.H15@28.822,48.877
  L6:Sig w0.1: v1(16.027,51.604) 16.024,51.607 16.024,52.548 cw(c16.22,52.548) 16.22,52.745 ; 16.222,52.745 16.41,52.745 cw(c16.41,52.589) 16.566,52.589 16.566,51.529 ccw(c16.852,51.529) 16.852,51.243 20.959,51.243 21.159,51.443 21.42,51.443 ccw(c21.42,51.643) 21.62,51.643 21.62,51.954 cw(c21.82,51.954) 21.82,52.154 cw(c21.82,51.954) 22.02,51.954 22.02,51.443 22.02,51.319 ccw(c22.22,51.319) 22.22,51.119 ccw(c22.22,51.319) 22.42,51.319 22.42,51.443 22.42,51.954 cw(c22.62,51.954) 22.62,52.154 cw(c22.62,51.954) 22.82,51.954 22.82,51.443 22.82,51.319 ccw(c23.02,51.319) 23.02,51.119 ccw(c23.02,51.319) 23.22,51.319 23.22,51.443 23.22,51.954 cw(c23.42,51.954) 23.42,52.154 cw(c23.42,51.954) 23.62,51.954 23.62,51.443 23.62,51.319 ccw(c23.82,51.319) 23.82,51.119 ccw(c23.82,51.319) 24.02,51.319 24.02,51.443 24.02,51.954 cw(c24.22,51.954) 24.22,52.154 cw(c24.22,51.954) 24.42,51.954 24.42,51.643 ccw(c24.62,51.643) 24.62,51.443 25.22,51.443 25.797,51.443 v1(28.363,48.877)
  L8:Bot w0.1: v1(16.027,51.604) 16.027,51.123 DD1.C3@16.67,50.479
DQ10: DD1.C8 DD18.H14 | length 23.9
  L1:Top w0.1: v1(28.822,48.418) DD18.H14@29.282,48.418
  L6:Sig w0.1: v1(13.077,50.104) 13.077,50.267 13.077,50.317 ccw(c12.877,50.317) 12.877,50.517 12.286,50.517 cw(c12.286,50.717) 12.286,50.917 13.628,50.917 ccw(c13.628,51.117) 13.628,51.317 13.277,51.317 cw(c13.277,51.517) 13.077,51.517 13.077,51.99 13.077,52.332 13.488,52.743 14.22,52.743 16.22,50.743 25.52,50.743 27.061,49.202 27.578,49.202 28.363,48.418 v1(28.822,48.418)
  L8:Bot w0.1: DD1.C8@12.67,50.479 13.045,50.104 v1(13.077,50.104)
DQ11: DD1.C2 DD18.F15 | length 23.9
  L1:Top w0.1: v1(27.443,47.958) DD18.F15@27.903,47.958
  L6:Sig w0.1: v1(17.072,50.081) 17.072,49.787 16.927,49.643 16.12,49.643 15.92,49.443 15.92,49.043 16.12,48.843 18.046,48.843 19.644,48.843 cw(c19.644,48.643) 19.844,48.643 19.844,48.595 ccw(c20.044,48.595) 20.244,48.595 20.244,48.702 cw(c20.444,48.702) 20.644,48.702 20.644,48.595 ccw(c20.844,48.595) 21.044,48.595 21.044,48.702 cw(c21.244,48.702) 21.444,48.702 21.444,48.595 ccw(c21.644,48.595) 21.844,48.595 21.844,48.643 cw(c22.044,48.643) 22.044,48.843 22.094,48.843 22.12,48.843 22.32,48.843 ccw(c22.32,49.043) 22.52,49.043 22.52,49.384 cw(c22.72,49.384) 22.72,49.584 cw(c22.72,49.384) 22.92,49.384 22.92,48.843 22.92,48.71 ccw(c23.12,48.71) 23.12,48.51 ccw(c23.12,48.71) 23.32,48.71 23.32,48.843 23.32,49.384 cw(c23.52,49.384) 23.52,49.584 cw(c23.52,49.384) 23.72,49.384 23.72,48.843 23.72,48.71 ccw(c23.92,48.71) 23.92,48.51 ccw(c23.92,48.71) 24.12,48.71 24.12,48.843 24.12,49.384 cw(c24.32,49.384) 24.32,49.584 cw(c24.32,49.384) 24.52,49.384 24.52,48.843 24.52,48.71 ccw(c24.72,48.71) 24.72,48.51 ccw(c24.72,48.71) 24.92,48.71 24.92,48.843 24.92,49.384 cw(c25.12,49.384) 25.12,49.584 cw(c25.12,49.384) 25.32,49.384 25.32,48.843 25.32,48.71 ccw(c25.52,48.71) 25.52,48.51 ccw(c25.52,48.71) 25.72,48.71 cw(c25.853,48.71) 25.853,48.843 25.92,48.843 26.099,48.843 26.984,47.958 v1(27.443,47.958)
  L8:Bot w0.1: v1(17.072,50.081) DD1.C2@17.47,50.479
DQ12: DD1.A7 DD18.G15 | length 23.9
  L1:Top w0.1: v1(27.903,48.418) DD18.G15@28.363,48.418
  L3:Sig w0.1: v1(13.977,52.304) 13.977,52.31 13.763,52.523 13.465,52.523 13.311,52.368 13.311,50.866 14.134,50.043 14.907,50.043 15.58,50.716 15.82,50.716 ccw(c15.82,50.916) 16.02,50.916 16.02,51.117 cw(c16.22,51.117) 16.22,51.317 cw(c16.22,51.117) 16.42,51.117 16.42,50.716 16.42,50.605 ccw(c16.62,50.605) 16.62,50.405 ccw(c16.62,50.605) 16.82,50.605 16.82,50.716 16.82,51.117 cw(c17.02,51.117) 17.02,51.317 cw(c17.02,51.117) 17.22,51.117 17.22,50.716 17.22,50.605 ccw(c17.42,50.605) 17.42,50.405 ccw(c17.42,50.605) 17.62,50.605 17.62,50.716 17.62,51.117 cw(c17.82,51.117) 17.82,51.317 cw(c17.82,51.117) 18.02,51.117 18.02,50.916 ccw(c18.22,50.916) 18.22,50.716 18.42,50.716 18.588,50.716 19.712,50.716 20.149,50.279 26.984,50.279 27.903,49.36 v1(27.903,48.418)
  L8:Bot w0.1: DD1.A7@13.47,52.079 13.695,52.304 v1(13.977,52.304)
DQ13: DD1.A2 DD18.E14 | length 24
  L1:Top w0.1: v1(27.443,47.039) DD18.E14@27.903,47.039
  L6:Sig w0.1: v1(19.12,48.168) 19.145,48.143 25.52,48.143 cw(c25.52,47.275) 26.134,47.889 26.821,47.201 ccw(c27.214,47.594) 27.214,47.039 v1(27.443,47.039)
  L8:Bot w0.1: DD1.A2@17.47,52.079 17.47,52.544 cw(c17.869,52.544) 17.869,52.943 19.636,52.943 cw(c19.636,52.559) 20.02,52.57 cw(c19.636,52.559) 20.02,52.559 20.02,52.476 20.02,52.426 ccw(c20.22,52.426) 20.22,52.226 20.689,52.226 cw(c20.689,52.026) 20.689,51.826 19.621,51.826 ccw(c19.621,51.626) 19.621,51.426 20.689,51.426 cw(c20.689,51.226) 20.689,51.026 19.621,51.026 ccw(c19.621,50.826) 19.621,50.626 20.689,50.626 cw(c20.689,50.426) 20.689,50.226 20.22,50.226 ccw(c20.22,50.026) 20.02,50.026 20.02,49.443 cw(c19.115,49.443) 19.755,48.803 v1(19.12,48.168)
DQ14: DD1.B8 DD18.G13 | length 24
  L1:Top w0.1: v1(28.822,47.499) DD18.G13@29.282,47.499
  L3:Sig w0.1: v1(13.995,51.704) 14.208,51.704 ccw(c14.208,51.917) 14.42,51.917 14.42,52.679 cw(c14.684,52.679) 14.684,52.943 14.876,52.943 14.926,52.943 ccw(c14.926,53.143) 15.126,53.143 15.126,53.401 cw(c15.326,53.401) 15.526,53.401 15.526,52.64 ccw(c15.726,52.64) 15.926,52.64 15.926,53.401 cw(c16.126,53.401) 16.326,53.401 16.326,53.143 ccw(c16.526,53.143) 16.526,52.943 16.853,52.943 18.17,52.943 cw(c18.17,52.26) 18.653,52.743 20.62,50.776 ccw(c21.094,51.249) 21.094,50.579 26.946,50.579 cw(c26.946,50.158) 27.244,50.456 28.497,49.202 28.688,49.012 29.052,48.648 cw(c28.822,48.418) 29.147,48.418 cw(c28.822,48.418) 29.147,48.417 cw(c28.822,48.418) 29.053,48.189 cw(c28.822,48.418) 29.052,48.188 28.957,48.093 28.89,48.026 ccw(c29.052,47.863) 28.822,47.863 v1(28.822,47.499)
  L8:Bot w0.1: DD1.B8@12.67,51.279 13.08,51.689 13.98,51.689 v1(13.995,51.704)
DQ15: DD1.A3 DD18.H13 | length 23.9
  L1:Top w0.1: v1(29.282,47.958) DD18.H13@29.742,47.958
  L6:Sig w0.1: v1(17.052,52.529) 19.02,52.529 ccw(c19.02,52.729) 19.22,52.729 19.22,53.354 cw(c19.42,53.354) 19.42,53.554 cw(c19.42,53.354) 19.62,53.354 19.62,52.529 19.62,51.893 ccw(c19.82,51.893) 19.82,51.693 ccw(c19.82,51.893) 20.02,51.893 20.02,52.529 20.02,53.354 cw(c20.22,53.354) 20.22,53.554 cw(c20.22,53.354) 20.42,53.354 20.42,52.529 20.42,51.893 ccw(c20.62,51.893) 20.62,51.693 ccw(c20.62,51.893) 20.82,51.893 20.82,52.529 20.82,53.354 cw(c21.02,53.354) 21.02,53.554 cw(c21.02,53.354) 21.22,53.354 21.22,52.729 ccw(c21.42,52.729) 21.42,52.529 21.43,52.529 25.17,52.529 27.174,50.526 29.147,48.552 29.282,48.418 v1(29.282,47.958)
  L8:Bot w0.1: DD1.A3@16.67,52.079 16.67,52.148 v1(17.052,52.529)
DQS_0_N: DD1.G3 DD18.D17 | length 24
  L1:Top w0.1: v1(15.427,47.454) cw(c15.502,47.454) 15.502,47.529 16.001,47.529 cw(c16.001,47.335) 16.196,47.335 16.196,47.124 ccw(c16.7,47.124) 16.7,46.621 16.754,46.621 ccw(c16.754,47.152) 17.285,47.152 17.285,47.268 cw(c17.546,47.268) 17.546,47.529 23.256,47.529 ccw(c23.256,48.079) 23.807,48.079 23.807,48.179 ccw(c23.243,48.179) 23.243,48.743 19.671,48.743 cw(c19.671,49.074) 19.34,49.074 19.34,49.099 cw(c19.671,49.099) 19.671,49.43 24.336,49.43 cw(c24.336,48.213) 25.196,49.074 25.913,48.358 cw(c25.522,47.968) 25.914,48.356 cw(c25.522,47.968) 26.065,48.07 cw(c25.522,47.968) 26.074,47.968 DD18.D17@26.065,47.958
  L8:Bot w0.1: v1(15.427,47.454) cw(c15.502,47.454) 15.502,47.529 16.067,47.529 cw(c16.067,46.676) DD1.G3@16.67,47.279
DQS_0_P: DD1.F3 DD18.E17 | length 24
  L1:Top w0.1: v1(15.427,47.904) ccw(c15.502,47.904) 15.502,47.829 16.001,47.829 cw(c16.001,47.335) 16.496,47.335 16.496,47.124 ccw(c16.7,47.124) 16.7,46.921 16.754,46.921 ccw(c16.754,47.152) 16.985,47.152 16.985,47.268 cw(c17.546,47.268) 17.546,47.829 23.119,47.829 ; 23.121,47.829 ccw(c23.121,48.079) 23.371,48.079 23.371,48.179 ccw(c23.107,48.179) 23.107,48.443 19.631,48.443 cw(c19.631,49.034) 19.344,48.517 cw(c19.631,49.034) 19.269,48.567 cw(c19.631,49.034) 19.163,48.672 cw(c19.631,49.034) 19.114,48.747 cw(c19.631,49.034) 19.04,49.034 19.04,49.139 cw(c19.631,49.139) 19.163,49.501 cw(c19.631,49.139) 19.269,49.607 cw(c19.631,49.139) 19.631,49.73 24.46,49.73 cw(c24.46,48.513) 25.32,49.374 ; 25.321,49.374 26.125,48.57 ccw(c26.515,48.96) 26.413,48.418 ccw(c26.515,48.96) 26.515,48.408 DD18.E17@26.524,48.418
  L8:Bot w0.1: v1(15.427,47.904) ccw(c15.502,47.904) 15.502,47.829 16.067,47.829 ccw(c16.067,48.683) DD1.F3@16.67,48.079
DQS_1_N: DD1.B7 DD18.H17 | length 24
  L1:Top w0.1: v1(14.177,51.104) 14.252,51.029 18.577,51.029 18.627,51.029 ccw(c18.627,51.229) 18.827,51.229 18.827,51.251 cw(c19.027,51.251) 19.227,51.251 19.227,51.229 ccw(c19.427,51.229) 19.427,51.029 19.72,51.029 20.12,51.029 20.32,51.029 ccw(c20.32,51.229) 20.52,51.229 20.52,51.928 cw(c21.02,51.928) 21.52,51.928 21.52,50.78 ccw(c21.72,50.78) 21.92,50.78 21.92,51.928 cw(c22.42,51.928) 22.92,51.928 22.92,50.78 ccw(c23.12,50.78) 23.32,50.78 23.32,51.928 cw(c23.82,51.928) 24.32,51.928 24.32,51.229 ccw(c24.52,51.229) 24.52,51.029 25.605,51.029 25.951,51.029 cw(c25.951,49.379) 27.119,50.546 27.843,49.822 ccw(c27.903,49.882) DD18.H17@27.903,49.797
  L8:Bot w0.1: DD1.B7@13.47,51.279 ccw(c13.72,51.279) 13.72,51.029 14.102,51.029 ccw(c14.102,51.104) v1(14.177,51.104)
DQS_1_P: DD1.C7 DD18.H16 | length 24
  L1:Top w0.1: v1(14.177,50.654) 14.252,50.729 20.12,50.729 20.32,50.729 ccw(c20.32,51.229) 20.82,51.229 20.82,51.928 cw(c21.02,51.928) 21.22,51.928 21.22,50.78 ccw(c21.72,50.78) 22.22,50.78 22.22,51.928 cw(c22.42,51.928) 22.62,51.928 22.62,50.78 ccw(c23.12,50.78) 23.62,50.78 23.62,51.928 cw(c23.82,51.928) 24.02,51.928 24.02,51.229 ccw(c24.52,51.229) 24.52,50.729 25.605,50.729 25.827,50.729 cw(c25.827,49.079) 26.994,50.246 27.745,49.495 ccw(c28.127,49.878) 28.127,49.337 DD18.H16@28.363,49.337
  L8:Bot w0.1: DD1.C7@13.47,50.479 cw(c13.72,50.479) 13.72,50.729 14.102,50.729 cw(c14.102,50.654) v1(14.177,50.654)
DRAM_1V5: C63.2 C65.1 C70.1 C72.1 DD1.A1 DD1.A8 DD1.B2 DD1.C1 DD1.C9 DD1.D2 DD1.D9 DD1.E9 DD1.F1 DD1.G7 DD1.H2 DD1.H9 DD1.K2 DD1.K8 DD1.N1 DD1.N9 DD1.R1 DD1.R9 DD18.C15 DD18.E11 DD18.E12 DD18.E13 DD18.F6 DD18.F7 DD18.F8 DD18.F9 DD18.F10 DD18.F11 DD18.G17 R3.2 R10.2 R42.2 | length 106.4
  L1:Top w0.25: v1(26.065,46.579) DD18.C15@26.524,46.579 ; v1(27.119,49.662) DD18.G17@27.444,49.337 ; DD18.E11@29.282,45.66 29.742,45.66 DD18.F11@29.742,46.12 ; DD18.F10@30.201,45.66 DD18.F9@30.661,45.201 v1(31.12,45.201) DD18.F8@31.12,44.741 DD18.F7@31.58,44.281 DD18.F6@32.04,43.822
  L1:Top w0.3: v2(7.363,38.424) 7.363,38.45 R3.2@7.863,38.95 ; DD18.E13@28.363,46.579 v1(28.822,46.579) DD18.E12@28.822,46.12
  L1:Top w0.6: R42.2@66.059,100.65 66.409,100.65 66.759,101 v2(66.759,101.4)
  L5:Sig w0.6: v2(16.14,54.479) 30.187,54.479 64.859,89.152 64.859,99.5 v2(66.759,101.4)
  L6:Sig w0.25: v1(26.065,46.579) v1(28.822,46.579) v1(29.742,45.66) 30.201,45.201 v1(31.12,45.201)
  L8:Bot w0.2: v1(11.472,40.481) DD1.R9@11.87,40.879 ; v1(11.472,42.081) DD1.N9@11.87,42.479 ; v1(11.472,46.081) DD1.H9@11.87,46.479 ; v1(11.472,48.481) DD1.E9@11.87,48.879 ; v1(11.472,49.281) DD1.D9@11.87,49.679 ; v1(11.472,50.081) DD1.C9@11.87,50.479 ; v1(12.272,44.481) DD1.K8@12.67,44.879 ; v1(12.272,51.681) DD1.A8@12.67,52.079 ; v1(13.072,46.881) DD1.G7@13.47,47.279 ; v1(17.072,44.481) DD1.K2@17.47,44.879 ; v1(17.072,49.281) DD1.D2@17.47,49.679 ; DD1.H2@17.47,46.479 v1(17.869,46.878) ; DD1.B2@17.47,51.279 v1(17.869,51.678) ; v1(17.872,40.481) DD1.R1@18.27,40.879 ; v1(17.872,50.081) DD1.C1@18.27,50.479 ; DD1.N1@18.27,42.479 v1(18.669,42.081) ; DD1.F1@18.27,48.079 v1(18.669,48.478) ; DD1.A1@18.27,52.079 v1(18.834,52.079)
  L8:Bot w0.25: v1(31.12,45.201) 31.12,44.279 32.02,43.379 R10.2@32.959,43.379
  L8:Bot w0.6: C63.2@12.67,53.979 15.878,53.979 16.14,54.241 v2(16.14,54.479)
  other v1: 10.84,53.179 11.34,53.179 11.87,53.179 10.84,53.779 11.34,53.779 11.87,53.779
F0ALE: D78.L8 DD2.17 DD4.17 DD6.17 DD8.17 DD18.P10 | length 135.7
  L1:Top w0.1: DD18.P10@33.878,49.343 DD18.P10@33.878,49.337 v1(34.338,49.337) ; D78.L8@37.139,148.993 v1(37.606,149.46) ; v1@53.459,87.94 DD2.17@54.809,87.94 ; v1@53.489,101.43 DD4.17@54.739,101.43
  L3:Sig w0.1: v1(37.606,149.46) 38.347,148.72 ccw(c38.655,149.028) 38.655,148.592 40.733,148.592 cw(c40.733,148.083) 41.093,148.443 ; 41.093,148.443 47.198,142.338 cw(c46.619,141.76) 47.438,141.76 47.438,141.457 47.438,107.65 ccw(c47.989,107.65) 47.599,107.26 v1(53.459,101.4)
  L6:Sig w0.1: v1(34.338,49.337) 34.338,48.877 34.203,48.743 33.788,48.328 33.788,48.078 33.533,47.823 33.533,47.117 36.112,44.539 40.718,44.539 53.459,57.279 v1(53.459,101.4)
  L8:Bot w0.1: v1(53.459,83.1) 53.859,83.5 DD6.17@54.814,83.5 ; v1(53.459,96.6) 53.859,97 DD8.17@54.814,97
  other v1: 53.459,87.92
F0CE0: D78.K4 DD2.9 DD18.U2 | length 128.8
  L1:Top w0.1: D78.K4@33.088,149.942 v1(33.556,149.475) ; DD18.U2@38.934,47.039 40.524,47.039 v1(40.92,46.643) ; v1@51.959,84.1 52.059,84 DD2.9@54.809,84
  L6:Sig w0.1: v1(33.556,149.475) 33.765,149.684 cw(c34.238,149.211) 34.238,149.88 35.19,149.88 cw(c35.19,149.398) 35.531,149.739 36.589,148.682 ccw(c36.955,149.048) 36.955,148.53 41.206,148.53 cw(c41.206,148.129) 41.49,148.412 43.057,146.845 43.093,146.809 ccw(c43.234,146.951) 43.376,146.809 43.384,146.818 cw(c43.526,146.676) 43.667,146.818 cw(c43.526,146.676) 43.667,146.535 43.484,146.352 ccw(c43.626,146.211) 43.484,146.069 ccw(c43.626,146.211) 43.767,146.069 43.95,146.252 cw(c44.091,146.111) 44.233,146.252 cw(c44.091,146.111) 44.233,145.969 44.224,145.961 ccw(c44.366,145.819) 44.224,145.678 44.521,145.381 54.583,135.319 cw(c54.036,134.772) 54.81,134.772 54.81,107.923 cw(c53.975,107.923) 54.565,107.333 52.11,104.878 ccw(c52.473,104.515) 51.959,104.515 v1(51.959,84.02) 51.959,57.63 40.972,46.643 v1(40.92,46.643)
F0CE1: DD4.9 DD18.T2 | length 61.1
  L1:Top w0.1: DD18.T2@38.474,46.579 38.934,46.579 39.433,46.081 v1(40.42,46.081) ; v1@52.479,97.45 DD4.9@54.729,97.45
  L6:Sig w0.1: v1(40.42,46.081) 41.087,46.081 52.459,57.453 52.459,79.8 v1(52.459,97.4)
F0CE2: D78.K5 DD2.10 DD18.N5 | length 130.6
  L1:Top w0.1: D78.K5@34.088,149.942 v1(34.556,149.475) ; DD18.N5@35.717,46.579 v1(36.176,46.579) ; v1@50.059,84.5 DD2.10@54.809,84.5
  L6:Sig w0.1: v1(34.556,149.475) 35.086,149.474 cw(c35.086,149.081) 35.364,149.359 36.302,148.42 ccw(c36.755,148.873) 36.755,148.232 40.397,148.232 cw(c40.397,147.872) 40.652,148.127 41.109,147.67 41.145,147.635 ccw(c41.286,147.776) 41.427,147.635 ; v1(36.176,46.579) 36.636,46.579 37.472,45.743 38.103,45.743 49.959,57.599 v1(49.959,84.5) 49.959,103.001 cw(c50.579,103.001) 50.141,103.439 54.324,107.623 ccw(c53.921,108.027) 54.492,108.027 54.492,133.719 ccw(c53.12,133.719) 54.09,134.689 42.473,146.306 42.276,146.503 cw(c42.417,146.645) 42.276,146.786 ccw(c42.135,146.928) 42.277,147.07 ccw(c42.135,146.928) 41.994,147.07 41.934,147.01 cw(c41.793,147.152) 41.652,147.01 cw(c41.793,147.152) 41.652,147.293 41.711,147.353 ccw(c41.57,147.494) 41.711,147.635 ccw(c41.57,147.494) 41.428,147.635
F0CE3: DD4.10 DD18.T3 | length 61.7
  L1:Top w0.1: DD18.T3@38.015,47.039 38.474,47.039 38.878,47.443 40.676,47.443 v1(40.94,47.179) ; v1@51.459,97.9 51.559,98 DD4.10@54.809,98
  L6:Sig w0.1: v1(40.94,47.179) 51.459,57.699 v1@51.459,97.9
  other v1: 51.459,97.96
F0CE4: DD6.9 DD18.N3 | length 53.1
  L1:Top w0.1: DD18.N3@36.636,45.66 v1(37.096,45.66)
  L6:Sig w0.1: v1(37.096,45.66) 37.12,45.66 37.338,45.443 38.203,45.443 50.459,57.699 50.459,87.2 50.938,87.679 v1(50.938,87.7)
  L8:Bot w0.1: v1(50.938,87.7) 53.086,87.7 53.286,87.5 DD6.9@54.814,87.5
F0CE5: DD8.9 DD18.P4 | length 67.5
  L1:Top w0.1: DD18.P4@36.636,46.579 v1(37.096,46.579)
  L6:Sig w0.1: v1(37.096,46.579) 37.555,46.579 37.892,46.243 38.203,46.243 49.459,57.499 49.459,79.2 49.459,100.7 v1(48.959,101.2)
  L8:Bot w0.1: v1(48.959,101.2) 53.089,101.2 53.289,101 DD8.9@54.814,101
F0CE6: DD6.10 DD18.M3 | length 52.9
  L1:Top w0.1: DD18.M3@36.176,45.201 v1(36.636,45.201)
  L6:Sig w0.1: v1(36.636,45.201) 38.361,45.201 50.959,57.799 50.959,79.5 v1(50.959,86.8)
  L8:Bot w0.1: v1(50.959,86.8) 53.456,86.8 53.458,86.799 53.659,87 DD6.10@54.814,87
F0CE7: DD8.10 DD18.R4 | length 64.8
  L1:Top w0.1: DD18.R4@37.096,47.039 v1(37.555,47.039)
  L6:Sig w0.1: v1(37.555,47.039) 38.499,47.039 48.959,57.499 48.959,79.1 v1(48.959,100.1)
  L8:Bot w0.1: v1(48.959,100.1) 53.359,100.1 53.759,100.5 DD8.10@54.814,100.5
F0CLE: D78.L7 DD2.16 DD4.16 DD6.16 DD8.16 DD18.R9 | length 137.5
  L1:Top w0.1: v1(34.797,48.877) DD18.R9@34.797,49.337 ; D78.L7@36.139,148.993 v1(36.606,149.46) ; v1(52.959,87.2) 53.259,87.5 DD2.16@54.809,87.5 ; v1(52.959,100.8) 52.959,100.9 53.059,101 DD4.16@54.809,101
  L3:Sig w0.1: v1(36.606,149.46) 37.639,148.428 ccw(c38.14,148.929) 38.14,148.221 40.274,148.221 cw(c40.274,147.235) 40.971,147.932 46.679,142.223 cw(c45.668,141.212) 47.098,141.212 47.098,106.747 ccw(c47.308,106.747) 47.16,106.599 v1(52.959,100.8)
  L6:Sig w0.1: v1(34.797,48.877) 34.797,48.15 34.598,47.951 34.201,47.951 33.974,47.724 33.974,47.137 36.292,44.819 40.486,44.819 52.959,57.293 v1(52.959,85) v1(52.959,100.8)
  L8:Bot w0.1: v1(52.959,85) 53.959,84 DD6.16@54.814,84 ; v1(52.959,98.5) 53.959,97.5 DD8.16@54.814,97.5
F0D0: D78.M10 DD2.29 DD4.29 DD6.29 DD8.29 DD18.U8 | length 142.1
  L1:Top w0.1: DD2.29@35.059,89.5 35.576,89.5 36.076,90 v1(39.019,90) v1@39.044,90 ; DD4.29@35.059,103 35.575,103 35.897,103.322 v1@39.019,103.322 ; DD18.U8@36.176,49.797 v1(36.176,50.256) ; D78.M10@39.088,147.942 v1(39.556,147.475)
  L3:Sig w0.1: v1(39.556,147.475) 39.937,147.094 cw(c39.348,146.505) 40.18,146.505 40.18,146.066 40.18,146.016 ccw(c40.38,146.016) 40.38,145.816 41.828,145.816 cw(c41.828,145.616) 41.828,145.416 40.36,145.416 ccw(c40.36,145.216) 40.36,145.016 41.828,145.016 cw(c41.828,144.816) 41.828,144.616 40.36,144.616 ccw(c40.36,144.416) 40.36,144.216 41.828,144.216 cw(c41.828,144.016) 41.828,143.816 40.36,143.816 ccw(c40.36,143.616) 40.36,143.416 41.828,143.416 cw(c41.828,143.216) 41.828,143.016 40.36,143.016 ccw(c40.36,142.816) 40.36,142.616 41.828,142.616 cw(c41.828,142.416) 41.828,142.216 40.36,142.216 ccw(c40.36,142.016) 40.36,141.816 41.828,141.816 cw(c41.828,141.616) 41.828,141.416 40.36,141.416 ccw(c40.36,141.216) 40.36,141.016 41.828,141.016 cw(c41.828,140.816) 41.828,140.616 40.38,140.616 ccw(c40.38,140.416) 40.18,140.416 40.18,139.906 40.18,139.273 cw(c40.001,139.273) 40.128,139.145 v1(39.92,138.937) v1@39.92,138.988
  L6:Sig w0.1: v1(36.176,50.256) 36.795,50.875 37.472,51.552 38.987,53.067 38.987,81.958 v1(39.019,81.99) v1(39.019,90) v1(39.019,95.5) v1(39.019,103.28) 39.019,103.38 ccw(c38.547,103.38) 38.881,103.714 36.715,105.881 cw(c37.109,106.276) 36.551,106.276 36.551,131.753 cw(c37.552,131.753) 36.844,132.461 39.727,135.344 ccw(c39.261,135.81) 39.92,135.81 v1(39.92,138.937)
  L8:Bot w0.1: DD6.29@35.064,82 v1@39.019,82 ; DD8.29@35.064,95.5 v1(39.019,95.5)
F0D1: D78.M9 DD2.30 DD4.30 DD6.30 DD8.30 DD18.N11 | length 138.6
  L1:Top w0.1: DD18.N11@32.959,49.337 v1(32.959,49.797) ; DD2.30@35.059,89 37.879,89 v1(38.179,88.7) ; DD4.30@35.059,102.5 37.879,102.5 v1(38.179,102.2) ; D78.M9@38.088,147.942 v1(38.556,147.475)
  L3:Sig w0.1: v1(38.556,147.475) 38.556,146.948 ccw(c38.941,146.948) 38.669,146.676 39.314,146.03 cw(c39.018,145.734) 39.437,145.734 39.437,145.649 39.437,145.313 ccw(c39.637,145.313) 39.637,145.113 39.733,145.113 cw(c39.733,144.913) 39.733,144.713 38.161,144.713 ccw(c38.161,144.513) 38.161,144.313 39.733,144.313 cw(c39.733,144.113) 39.733,143.913 38.161,143.913 ccw(c38.161,143.713) 38.161,143.513 39.733,143.513 cw(c39.733,143.313) 39.733,143.113 38.161,143.113 ccw(c38.161,142.913) 38.161,142.713 39.733,142.713 cw(c39.733,142.513) 39.733,142.313 38.161,142.313 ccw(c38.161,142.113) 38.161,141.913 39.733,141.913 cw(c39.733,141.713) 39.733,141.513 38.161,141.513 ccw(c38.161,141.313) 38.161,141.113 39.733,141.113 cw(c39.733,140.913) 39.733,140.713 38.161,140.713 ccw(c38.161,140.513) 38.161,140.313 39.237,140.313 cw(c39.237,140.113) 39.437,140.113 39.437,140.063 39.437,139.539 cw(c39.081,139.539) 39.333,139.288 39.074,139.029 ccw(c39.138,138.965) v1(39.047,138.965)
  L6:Sig w0.1: v1(32.959,49.797) 34.557,49.797 38.179,53.419 v1(38.179,82.4) v1(38.179,88.7) v1(38.179,102.2) 38.179,103.285 ccw(c37.779,103.285) 38.062,103.568 36.149,105.481 cw(c36.628,105.96) 35.95,105.96 35.95,131.705 cw(c37.72,131.705) 36.469,132.956 38.876,135.363 ccw(c38.472,135.767) 39.043,135.767 v1@39.043,138.948
  L8:Bot w0.1: DD6.30@35.064,82.5 36.159,82.5 36.359,82.5 36.463,82.397 38.176,82.397 v1(38.179,82.4) ; DD8.30@35.064,96 36.159,96 36.359,96 36.459,95.9 v1(38.179,95.9)